# Altium PCB BLE_product-v1.0.PcbDoc (part 1 of 2)
Units mm, origin at the board's own origin, x right, y up, seen from the top; angles counter-clockwise.
Board outline 12 x 12.89 mm, 4 copper layers (Top Layer, Layer 2, Layer 3, Bottom Layer), stack 0.999 mm thick; 45 components, 33 nets, 183 pads, 89 vias.
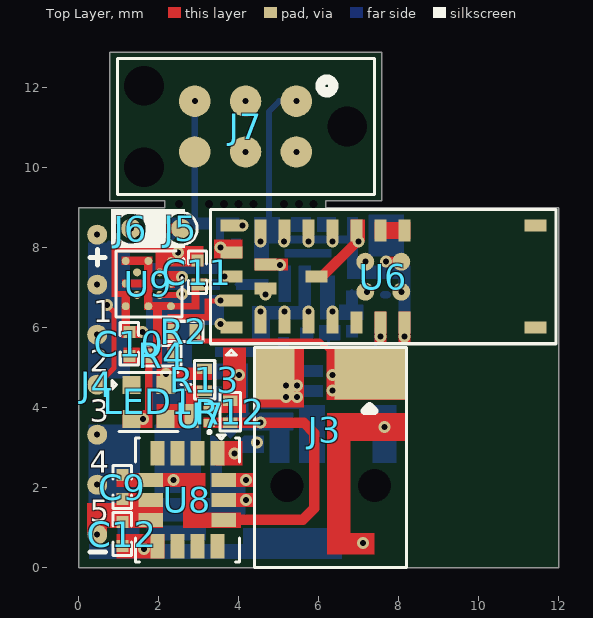
[diagram p0: Top Layer view]
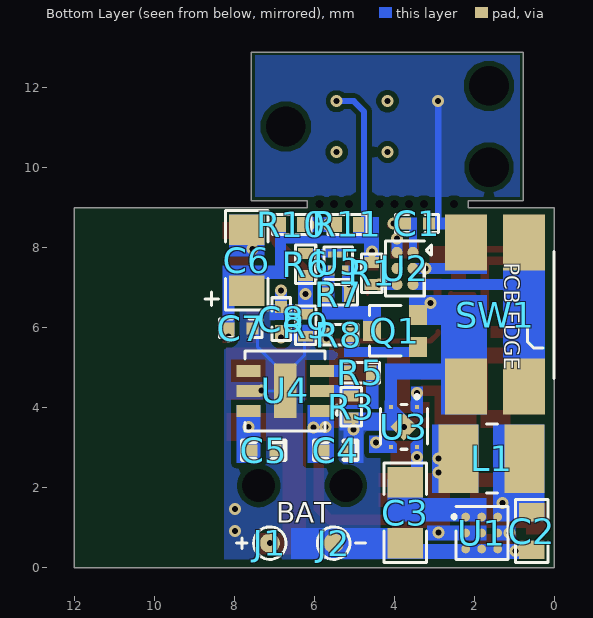
[diagram p1: Bottom Layer view, seen from below]
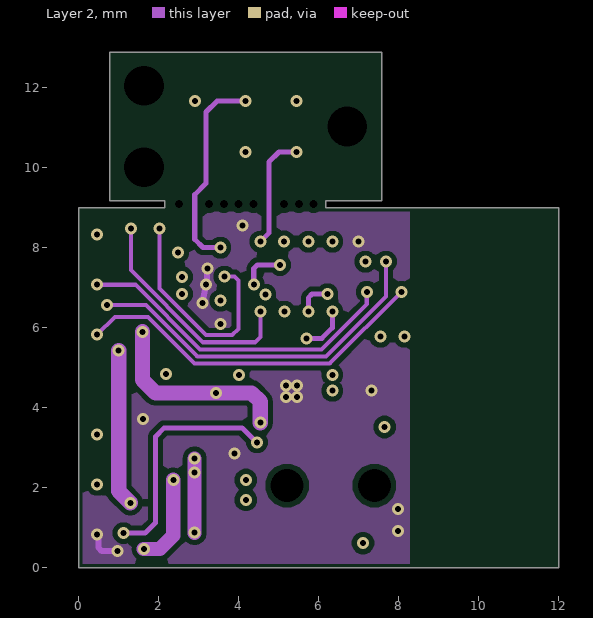
[diagram p2: Layer 2]
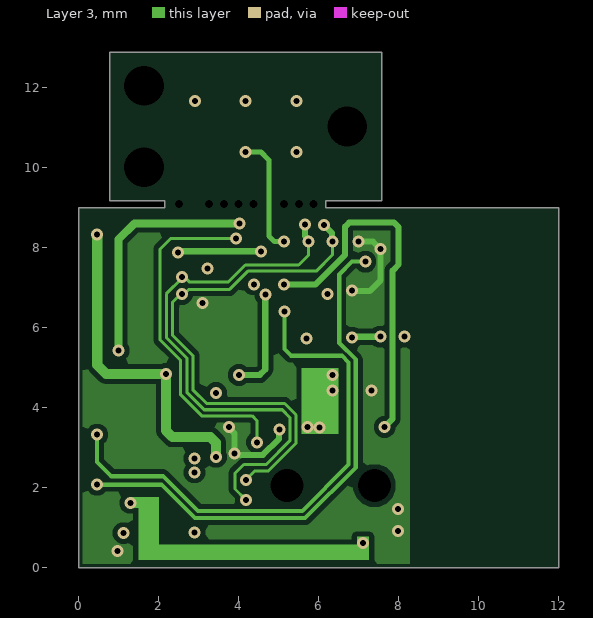
[diagram p3: Layer 3]
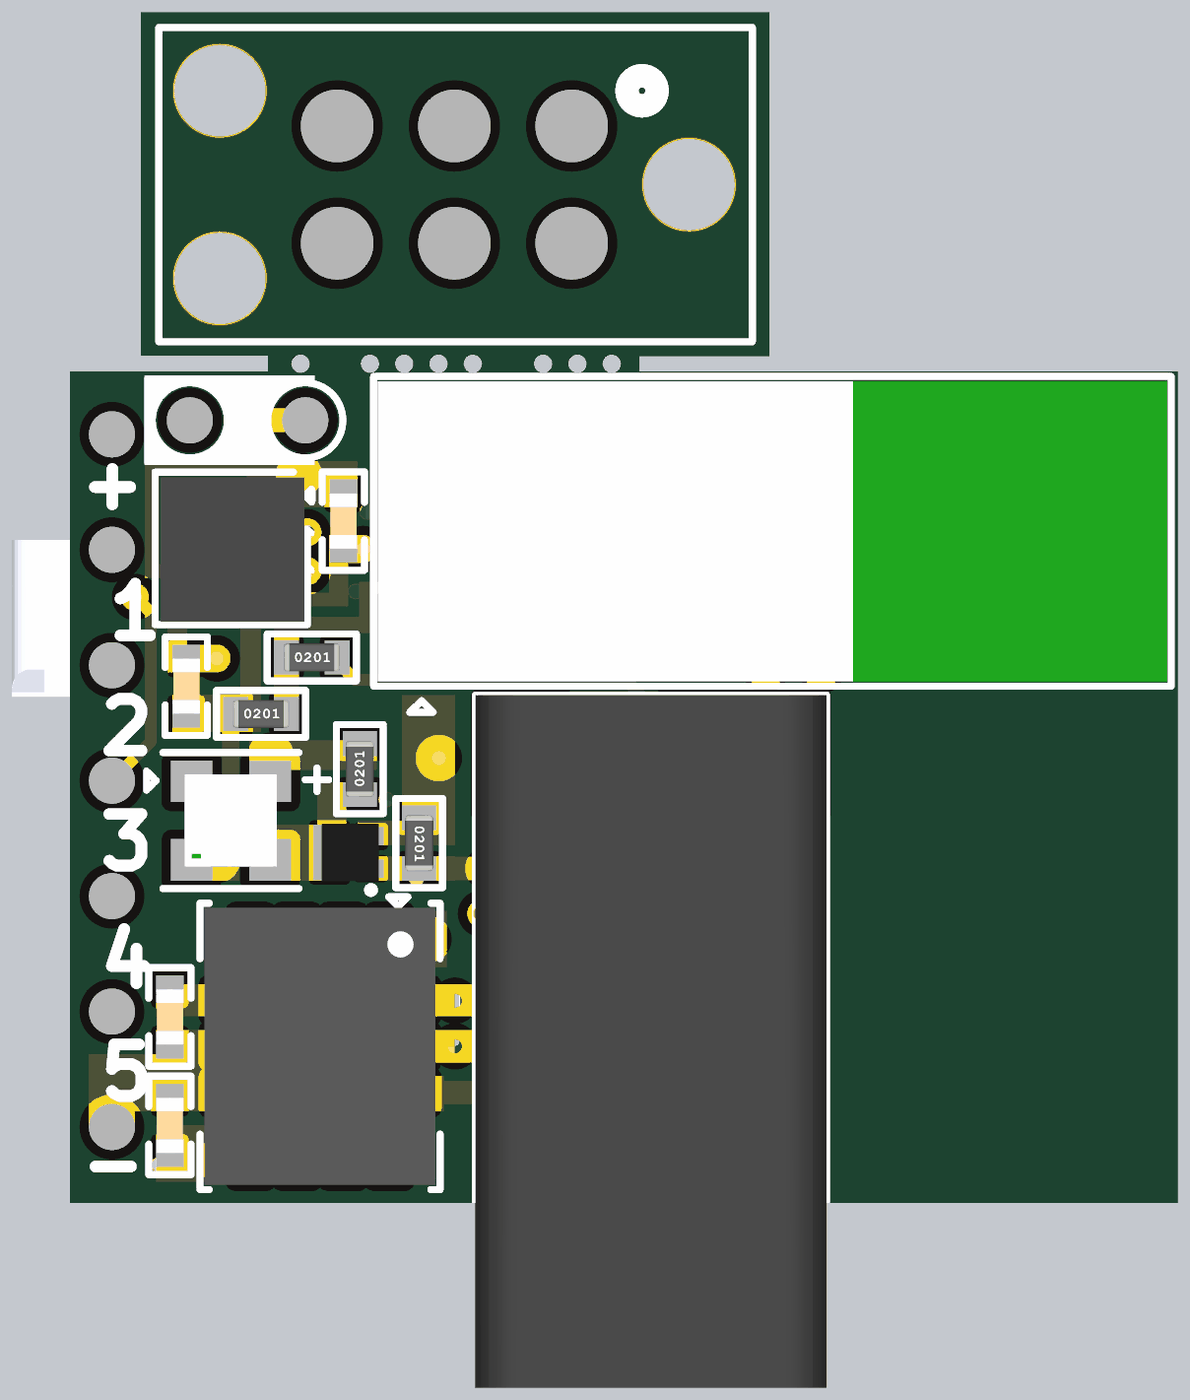
[diagram p4: 3D render of the assembled board from above, using the file's embedded part models]
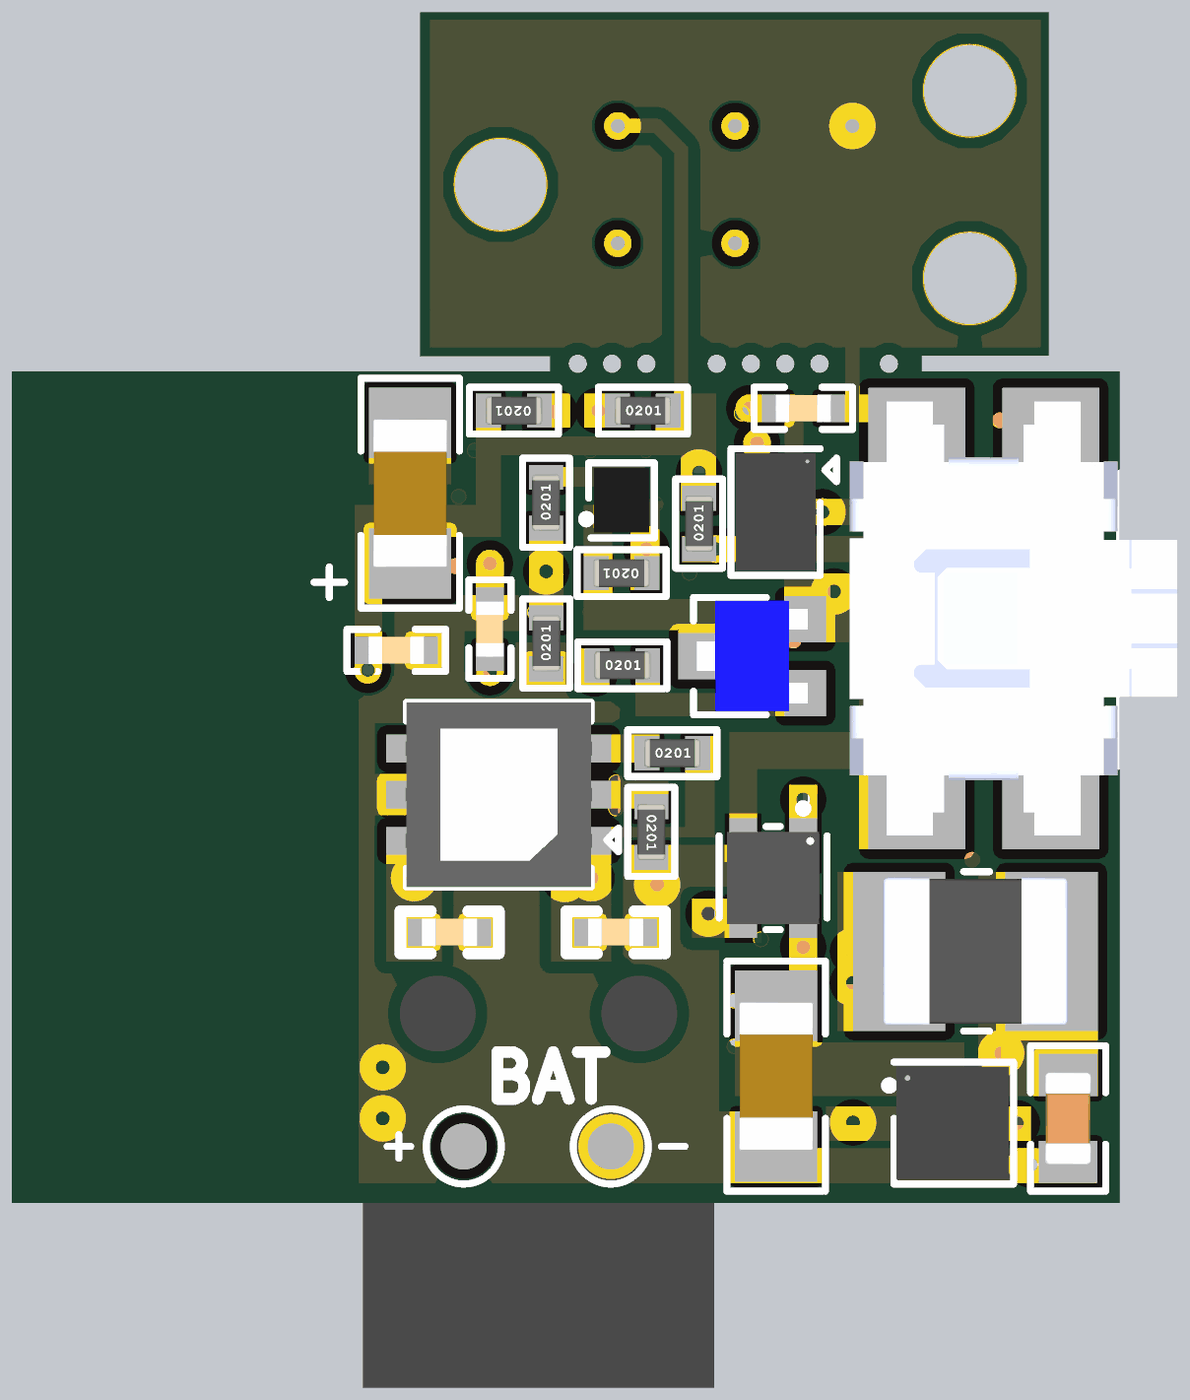
[diagram p5: 3D render of the assembled board from below, using the file's embedded part models]

## Layer stack, top to bottom
Top Solder: solder mask 0.0102, Solder Resist, Dk 3.5
Top Layer: signal copper 0.035
Dielectric 2: prepreg 0.1295, PP-017, Dk 4.3
Layer 2: signal copper 0.035
Dielectric 1: dielectric 0.6, FR-4, Dk 4.8
Layer 3: signal copper 0.035
Dielectric 3: prepreg 0.1295, PP-017, Dk 4.3
Bottom Layer: signal copper 0.035
Bottom Solder: solder mask 0.0102, Solder Resist, Dk 3.5

## Board outline
0,0 0,9 2.146,9 2.146,9.169 0.77,9.169 0.77,12.886 7.576,12.886 7.576,9.167 6.166,9.167 6.166,9 12,9 12,0

## Design rules (kind name [scope] priority, off if disabled: settings)
Clearance [All] p1: gap=0.076 ignorepadtopadclearanceinfootprint=FALSE except(0.127: Arc-Poly Track-Poly SMDPad-Poly THPad-Poly Via-Poly Fill-Poly Poly-Poly)
ComponentClearance [All] p1: gap=0 collisioncheckmode=3 verticalgap=0 showdistances=FALSE
HoleToHoleClearance [All] p1: gap=0.127 allowstackedmicrovias=TRUE
MinimumSolderMaskSliver [All] p1: minsoldermaskwidth=0
PolygonConnect PolygonConnect_TOP [HasFootprint('TC2030-IDC-NL_')] p1: connectstyle=Relief reliefconductorwidth=0.127 reliefentries=4 polygonreliefangle="90 Angle" airgapwidth=0.127
PolygonConnect [All] p2: connectstyle=Direct reliefconductorwidth=0.102 reliefentries=4 polygonreliefangle="90 Angle" airgapwidth=0.102
RoutingVias [All] p1: holewidth=0.15 width=0.3 viastyle="Through Hole" minholewidth=0.15 minwidth=0.3 maxholewidth=0.15 maxwidth=0.3
SilkToSilkClearance [All] p1: silktosilkclearance=0
SilkToSolderMaskClearance [IsPad] p1: minsilkscreentomaskgap=0 clearancetoexposedcopper=TRUE
SolderMaskExpansion [All] p1: expansion=0.102 istentingtop=FALSE
Width [All] p1: maxlimit=0.381 minlimit=0.076 preferedwidth=0.102 minimp=50.000000 maximp=50.000000 favimp=50.000000
25 further rules are at their usual default settings.

## Classes and differential pairs
component class U_Power_Sheet: C1 C2 C3 C4 C5 J1 J2 J3 L1 Q1 R1 R2 R3 R4 R5 R6 R7 R8 R9 SW1 U1 U2 U3 U4 U5
component class U_IMU_Sensor_Sheet: C9 C10 C11 C12 U8 U9
component class U_BLE_Module_Sheet: 2 C6 C7 C8 J4 J5 J6 J7 LED1 R10 R11 R12 R13 U6 U7

## Components (designator, comment, footprint, x,y, rotation, side; value= is the part's Value field where it differs from the comment)
C1 "0.1uF" CAP-0201 3.427,8.602 r0 bottom
C2 "10uF" Cap-0402 0.56,0.913 r90 bottom
C3 "22uF" Cap-0603 3.721,1.37 r90 bottom
C4 "1uF" CAP-0201 5.459,2.928 r0 bottom
C5 "2.2uf" CAP-0201 7.258,2.928 r0 bottom value=2.2uF
C6 "100uF" F980J107MMAAXE 7.684,6.92 r90 bottom
C7 "0.1uF" CAP-0201 7.834,5.981 r0 bottom
C8 "1uF" CAP-0201 6.821,6.21 r270 bottom
C9 "0.1uF" CAP-0201 1.084,2.011 r90 top
C10 "0.1uF" CAP-0201 1.261,5.593 r90 top
C11 "0.1uF" CAP-0201 2.963,7.381 r90 top
C12 "0.1uF" CAP-0201 1.084,0.838 r270 top
J1 "1 Sensor Pad 0.5mm" "1 Sensor Pad 0.5mm" 7.104,0.609 r180 bottom
J2 "1 Sensor Pad 0.5mm" "1 Sensor Pad 0.5mm" 5.512,0.609 r180 bottom
J3 "DC-096" DC-096 6.14,3.448 r270 top locked
J4 "Sensor Pads 0.5mm Dia" "Sensor-Pads 0.5mm Dia" 0.457,4.57 r270 top
J5 "1 Sensor Pad 0.5mm" "1 Sensor Pad 0.5mm" 2.551,8.471 r90 top
J6 "1 Sensor Pad 0.5mm" "1 Sensor Pad 0.5mm" 1.301,8.471 r90 top
J7 "TC2030-IDC-NL" TC2030-IDC-NL_ 4.166,11.024 r180 top
L1 "470nH" IND-0806 1.563,2.721 r180 bottom
LED1 "XL-1010RGBC-WS2812B" XL-1010RGBC-WS2812B 1.745,4.138 r0 top
Q1 "MMBT3904M" SOT-723 3.981,5.918 r90 bottom
R1 "10K" Res-0201 4.556,7.353 r90 bottom
R2 "22K" Res-0201 2.621,5.903 r0 top
R3 "10K" Res-0201 5.073,4.015 r270 bottom
R4 "33k" Res-0201 2.071,5.293 r0 top
R5 "10K" Res-0201 4.845,4.867 r180 bottom
R6 "100K" Res-0201 6.212,7.579 r90 bottom
R7 "4.7K" Res-0201 5.395,6.818 r0 bottom
R8 "4.7K" Res-0201 5.386,5.819 r180 bottom
R9 "100K" Res-0201 6.21,6.056 r90 bottom
R10 "4.7K" Res-0201 6.561,8.576 r0 bottom
R11 "4.7K" Res-0201 5.164,8.576 r180 bottom
R12 "10K" Res-0201 3.784,3.894 r270 top
R13 "10K" Res-0201 3.141,4.695 r90 top
SW1 "EVQ-P7A01P" EVQP7A01P 1.473,6.325 r90 bottom locked
U1 "FAN48610UC50X" "WLCSP-9 (1.22x1.22)" 1.811,0.863 r180 bottom
U2 "MAX16150AWT+" WLP-6(0.83x1.24) 3.728,7.478 r270 bottom
U3 "TLV73330PDQNR" X2-SON-4(1x1) 3.754,3.515 r270 bottom
U4 "FAN54120UC420X" DFN-6-EP(2x2) 6.725,4.418 r0 bottom
U5 "CSD25501F3" PicoStar-3 5.395,7.63 r180 bottom
U6 "EYSHSNZWZ" EYSHSNZWZ 7.609,7.27 r0 top locked
U7 "NTNS3193NZT5G" X-LLGA-3 3.037,3.793 r90 top
U8 "BMI323" "14-LGA (2.5x3)" 2.711,1.693 r270 top
U9 "BMM150" "12-WLCSP (1.56x1.56)" 1.736,7.098 r0 top locked

## Footprints (in the part's own frame and the unit in brackets; to place one, negate y for a bottom-side part, rotate by r counter-clockwise, add the part's x,y. Pads: shape width x height; smd on the part's side, far side on the other; paste and mask are expansions set on the pad)
"1 Sensor Pad 0.5mm" [mm]
  round 0.5 smd: 1(0,0)
  silkscreen extent -0.41,-0.41 0.4,0.41
"12-WLCSP (1.56x1.56)" [mm]
  round 0.2 smd mask+0.05: A1(0.566,0.566) A3(0.566,0) A5(0.566,-0.566) B2(0.283,0.283) B4(0.283,-0.283) C1(0,0.566) C5(0,-0.566) D2(-0.283,0.283) D4(-0.283,-0.283) E1(-0.566,0.566) E3(-0.566,0) E5(-0.566,-0.566)
  silkscreen extent -0.81,-0.84 0.89,0.81, body extent -0.75,-0.81 0.81,0.75, height 0.6
"14-LGA (2.5x3)" [mm]
  rect 0.61x0.35 smd: 1(-1.16,0.75) 2(-1.16,0.25) 3(-1.16,-0.25) 4(-1.16,-0.75) 8(1.16,-0.75) 9(1.16,-0.25) 10(1.16,0.25) 11(1.16,0.75)
  rect 0.35x0.61 smd: 5(-0.5,-0.91) 6(0,-0.91) 7(0.5,-0.91) 12(0.5,0.91) 13(0,0.91) 14(-0.5,0.91)
  silkscreen extent -1.55,-1.3 1.55,1.3, body extent -1.5,-1.25 1.5,1.25, height 0.86
CAP-0201 [mm]
  rect 0.3x0.3 smd mask+0.055: 1(-0.3,0) 2(0.3,0)
  silkscreen extent -0.53,-0.23 0.53,0.23, body extent -0.3,-0.15 0.3,0.15, height 0.28
Cap-0402 [mil]
  rect 18x25 smd mask+2.36: 1(-18.5,0) 2(18.5,0)
  silkscreen extent -31,-16 31,16, body extent -20,-10 20,10, height 19
Cap-0603 [mil]
  rect 30x35 smd mask+2.36: 1(-30,0) 2(30,0)
  silkscreen extent -49,-21 49,21, body extent -32,-16 31,16, height 34
DC-096 [mm]
  rect 1.3x1.8 smd mask+0.05: 1(-1.4,1.154)
  rect 1.3x1 smd mask+0.05: 2(-1.4,-1.246)
  round 0 hole 0.82 unplated mask+0.05: MH(1.4,1.246) MH(1.4,-0.937)
  silkscreen extent -2.05,-1.75 -0.46,2.05, body extent -2.05,-1.75 5.45,2.05, height 3.8
DFN-6-EP(2x2) [mm]
  rect 0.6x0.3 smd: 1(-0.917,0.5) 2(-0.917,0) 3(-0.917,-0.5) 4(0.918,-0.5) 5(0.918,0) 6(0.918,0.5)
  rect 0.56x1.37 smd: 7(0,0)
  silkscreen extent -1,-1 1,1, body extent -1.01,-1 1.01,1, height 0.76
EVQP7A01P [mm]
  rect 1.4x1.05 smd: 1(-1.8,0.725) 1(1.8,0.725) 2(-1.8,-0.725) 2(1.8,-0.725)
  silkscreen extent -1.6,-1.47 1.57,-0.81, body extent -2.35,-2.1 2.35,1.45, height 1.35
EYSHSNZWZ [mm]
  rect 0.55x0.3 smd: 1(-3.8,-1.275) 18(-3.8,1.275) 19(-3.8,0.6) 20(-3.8,0) 21(-3.8,-0.6) 22(-2.95,-0.3) 25(-2.95,0.3) 26(-1.675,0) 27(3.8,-1.275) 28(3.8,1.275)
  rect 0.3x0.55 smd: 2(-3.075,-1.15) 3(-2.475,-1.15) 4(-1.875,-1.15) 5(-1.275,-1.15) 6(-0.675,-1.15) 7(-0.075,-1.15) 8(0.525,-1.15) 11(0.525,1.15) 12(-0.075,1.15) 13(-0.675,1.15) 14(-1.275,1.15) 15(-1.875,1.15) 16(-2.475,1.15) 17(-3.075,1.15)
  round 0.45 smd: 9(0.45,-0.375) 10(0.45,0.375) 23(-0.45,-0.375) 24(-0.45,0.375)
  silkscreen extent -4.32,-1.68 4.32,1.68, body extent -4.28,-1.63 4.28,1.63, height 0.85
F980J107MMAAXE [mil]
  rect 30x35 smd mask+2.36: 1(0,0) 2(60,0)
  silkscreen extent -19,-21 79,21, body extent -2,-16 61,16, height 34
IND-0806 [mm]
  rect 1x1.72 smd: 1(-0.825,0) 2(0.825,0)
  silkscreen extent -0.13,-0.86 0.15,0.86, body extent -1,-0.8 1,0.8, height 1.2
PicoStar-3 [mm]
  rect 0.152x0.25 smd mask+0.05: 1(-0.175,-0.2) 2(0.175,-0.2)
  rect 0.5x0.152 smd mask+0.05: 3(0,0.2)
  silkscreen extent -0.41,-0.43 0.36,0.38, body extent -0.3,-0.38 0.3,0.32, height 0.2
Res-0201 [mm]
  rect 0.27x0.37 smd mask+0.055: 1(-0.275,0) 2(0.275,0)
  silkscreen extent -0.48,-0.25 0.48,0.25, body extent -0.3,-0.15 0.3,0.15, height 0.29
"Sensor-Pads 0.5mm Dia" [mm]
  round 0.5 smd: 1(-3.75,0) 2(-2.5,0) 3(-1.25,0) 4(0,0) 5(1.25,0) 6(2.5,0) 7(3.75,0)
SOT-723 [mm]
  rect 0.5x0.45 smd: 1(-0.4,-0.575) 2(0.4,-0.575) 3(0,0.575)
  silkscreen extent -0.64,-0.15 0.64,0.64, body extent -0.6,-0.6 0.6,0.6, height 0.5
TC2030-IDC-NL_ [mil]
  round 30.98 smd: 1(-50,-25) 1(-50,-25) 2(-50,25) 3(0,-25) 4(0,25) 5(50,-25) 6(50,25)
  round 0 hole 39.02: MP1(-100,0) MP2(100,40) MP3(100,-40)
  silkscreen extent -127,-67 126,67
"WLCSP-9 (1.22x1.22)" [mm]
  round 0.218 smd mask+0.055: A1(-0.4,0.4) A2(0,0.4) A3(0.4,0.4) B1(-0.4,0) B2(0,0) B3(0.4,0) C1(-0.4,-0.4) C2(0,-0.4) C3(0.4,-0.4)
  silkscreen extent -0.71,-0.66 0.66,0.66, body extent -0.61,-0.61 0.61,0.61, height 0.59
WLP-6(0.83x1.24) [mm]
  round 0.28 smd mask+0.055: A1(-0.4,0.2) A2(0,0.2) A3(0.4,0.2) B1(-0.4,-0.2) B2(0,-0.2) B3(0.4,-0.2)
  silkscreen extent -0.69,-0.48 0.69,0.66, body extent -0.64,-0.43 0.64,0.43, height 0.69
X2-SON-4(1x1) [mm]
  rect 0.1x0.1 smd paste-1 mask+0: 1(-0.5,0.325) 2(-0.5,-0.325) 3(0.5,-0.325) 4(0.5,0.325)
  rect 0.48x0.48 smd rot 135: 5(0,0)
  Top Layer region: 0.42,0.175 0.22,0.375 0.22,0.475 0.65,0.475 0.65,0.175
  Top Layer region: 0.22,-0.475 0.22,-0.375 0.42,-0.175 0.65,-0.175 0.65,-0.475
  Top Layer region: -0.65,-0.475 -0.65,-0.175 -0.42,-0.175 -0.22,-0.375 -0.22,-0.475
  Top Layer region: -0.42,0.175 -0.65,0.175 -0.65,0.475 -0.12,0.475
  silkscreen extent -0.78,-0.58 0.56,0.58, body extent -0.5,-0.5 0.5,0.5, height 0.58
X-LLGA-3 [mm]
  rect 0.2x0.28 smd mask+0.05: 1(-0.175,-0.222) 2(0.175,-0.222)
  rect 0.6x0.35 smd mask+0.05: 3(0,0.223)
  silkscreen extent -0.43,-0.25 -0.38,-0.2, body extent -0.31,-0.31 0.31,0.31, height 0.29
XL-1010RGBC-WS2812B [mm]
  rect 0.45x0.45 smd: 1(-0.425,0.425) 2(0.425,0.425) 3(-0.425,-0.425) 4(0.425,-0.425)
  silkscreen extent -0.74,-0.74 0.74,0.74, body extent -0.5,-0.5 0.5,0.5, height 0.81

## Part data
C1 C7 C9 C10 C11 C12: library part CC0201KRX5R6BB104, "CAP CER 0.1UF 10V X5R 0201", Capacitance=100nF, Case Code (Imperial)=0201, Case Code (Metric)=0603, Dielectric=X5R, LCSC Part Number=C190183, Manufacturer=Yageo, Max Operating Temperature=85°C, Min Operating Temperature=-55°C, Resistor Type=Ceramic, Supplier Part Number 1=603-CC201KRX5R6BB104, Tolerance=10%, Voltage Rating=10V, Case/Package=0201, Category="Ceramic Capacitors", ComponentLink1Description=https://datasheet.ciiva.com/11587/upy-gphc-x5r-4v-to-50v-12-11587190.pdf?src-supplier=Avnet, ComponentLink1URL=https://datasheet.ciiva.com/11587/upy-gphc-x5r-4v-to-50v-12-11587190.pdf?src-supplier=Avnet, Construction=Flat, Depth=0.3mm, Halogen Free="Halogen Free", Height=0.3mm, Lead Free="Lead Free", Length=0.6mm, Manufacturer Part Number=CC0201KRX5R6BB104, Mount="Surface Mount", Packaging="Tape and Reel", Pricing 1="1=0.10000, 10=0.02400, 50=0.02400, 100=0.01900, 1000=0.01100, 10000=0.00900 (USD)", Radiation Hardening=No, RoHS=Yes, RoHS Compliant=Yes, Series=CC, Stock 1=824403, Supplier 1=Mouser, Termination=SMD/SMT, Thickness=0.013inch, Voltage Rating (DC)=10V, Weight=6E-06oz, Width=0.012inch
C2: library part CL05A106MP5NUNC, "CAP CER 10UF 10V X5R 0402", Case Code (Imperial)=0402, Case Code (Metric)=1005, Dielectric=X5R, LCSC Part Number=C315248, Manufacturer=Samsung, Max Operating Temperature=85°C, Min Operating Temperature=-55°C, Package Quantity=1, Tolerance=20%, Voltage Rating=10V, Capacitance=10uF, Case/Package=0402, Category="Ceramic Capacitors", ComponentLink1Description=https://datasheet.ciiva.com/25721/cl05a106mp5nunc-25721584.pdf?src-supplier=Digi-Key, ComponentLink1URL=https://datasheet.ciiva.com/25721/cl05a106mp5nunc-25721584.pdf?src-supplier=Digi-Key, ComponentLink2Description=https://datasheet.ciiva.com/26838/getdatasheetpartid-745310-26838170.pdf?src-supplier=Verical, ComponentLink2URL=https://datasheet.ciiva.com/26838/getdatasheetpartid-745310-26838170.pdf?src-supplier=Verical, Construction=Flat, Contact Plating=Tin, Depth=0.5mm, Item Type=Capacitor, Lead Free="Lead Free", Length=1mm, Manufacturer Part Number=CL05A106MP5NUNC, Mount="Surface Mount", Packaging="Tape and Reel", Pricing 1="10000=0.02537 (USD)", Radiation Hardening=No, RoHS=Yes, RoHS Compliant=Yes, Series=CL, Stock 1=1729850, Supplier 1=Avnet, Supplier Part Number 1=CL05A106MP5NUNC, Termination=Wraparound, Thickness=0.028inch, Width=0.02inch
C3: library part CC0603MRX5R6BB226, "CAP CER 22UF 10V X5R 0603", Case Code (Imperial)=0603, Case Code (Metric)=1608, Dielectric=X5R, LCSC Part Number=C109447, Manufacturer=Yageo, Max Operating Temperature=85°C, Min Operating Temperature=-55°C, Package Quantity=4000, Supplier Part Number 1=311-1819-1-ND, Tolerance=20%, Voltage Rating=10V, Capacitance=22uF, Case/Package=0603, Category="Ceramic Capacitors", ComponentLink1Description=http://www.mouser.com/ds/2/447/Yageo_UPY-GP_NP0_16V-to-50V_9-358835.pdf?src-supplier=Mouser, ComponentLink1URL=http://www.mouser.com/ds/2/447/Yageo_UPY-GP_NP0_16V-to-50V_9-358835.pdf?src-supplier=Mouser, ComponentLink2Description=http://www.yageo.com/documents/recent/UPY-GPHC_X5R_4V-to-50V_25.pdf?src-supplier=Digi-Key, ComponentLink2URL=http://www.yageo.com/documents/recent/UPY-GPHC_X5R_4V-to-50V_25.pdf?src-supplier=Digi-Key, Halogen Free="Halogen Free", Height=0.8mm, Item Type=Capacitor, Lead Free="Lead Free", Length=0.063inch, Manufacturer Part Number=CC0603MRX5R6BB226, Mount="Surface Mount", Packaging="Tape and Reel", Pricing 1="1=0.68000, 10=0.48000, 50=0.36300, 100=0.31610, 500=0.23416, 1000=0.19903 (USD)", RoHS=Yes, RoHS Compliant=Yes, Stock 1=19628, Supplier 1=Digi-Key, Termination=SMD/SMT, Thickness=0.035inch, Voltage Rating (DC)=10V, Weight=7.1E-05oz, Width=0.8mm
C4: library part CC0201MRX5R6BB105, "CAP CER 1UF 10V X5R 0201", LCSC Part Number=C605210, Manufacturer=Yageo, Supplier Part Number=311-3474-1-ND, Category="Ceramic Capacitors", ComponentLink1Description=https://datasheet.octopart.com/CC0201MRX5R6BB105-Yageo-datasheet-158238148.pdf?src-supplier=Farnell, ComponentLink1URL=https://datasheet.octopart.com/CC0201MRX5R6BB105-Yageo-datasheet-158238148.pdf?src-supplier=Farnell, ComponentLink2Description=http://www.yageo.com/documents/recent/UPY-GPHC_X5R_4V-to-50V_25.pdf?src-supplier=Digi-Key, ComponentLink2URL=http://www.yageo.com/documents/recent/UPY-GPHC_X5R_4V-to-50V_25.pdf?src-supplier=Digi-Key, ComponentLink3Description=https://datasheet.octopart.com/CC0201MRX5R6BB105-Yageo-datasheet-137700082.pdf?src-supplier=Future+Electronics, ComponentLink3URL=https://datasheet.octopart.com/CC0201MRX5R6BB105-Yageo-datasheet-137700082.pdf?src-supplier=Future+Electronics, Item Type=Capacitor, Manufacturer Part Number=CC0201MRX5R6BB105, Pricing="1=0.19, 10=0.135, 50=0.0764, 100=0.0633, 500=0.04436, 1000=0.03672, 2500=0.03418, 5000=0.03127 (USD)", RoHS=Yes, Stock=772400, Supplier=Digi-Key
C5: library part CC0201MRX5R6BB225, "CAP CER 2.2UF 10V X5R 0201", Case/Package=0201, LCSC Part Number=C2186869, Manufacturer=Yageo, Max Operating Temperature=85°C, Min Operating Temperature=-55°C, Supplier Part Number=603-CC0201MRX56BB225, Tolerance=20%, Voltage Rating=10V, Category="Ceramic Capacitors", ComponentLink1Description=https://www.yageo.com/upload/media/product/productsearch/datasheet/mlcc/UPY-GPHC_X5R_4V-to-50V_26.pdf?src-supplier=Digi-Key, ComponentLink1URL=https://www.yageo.com/upload/media/product/productsearch/datasheet/mlcc/UPY-GPHC_X5R_4V-to-50V_26.pdf?src-supplier=Digi-Key, Item Type=Capacitor, Manufacturer Part Number=CC0201MRX5R6BB225, Mounting Technology="Surface Mount", Packaging="Tape and Reel", Pricing="1=0.43, 10=0.294, 50=0.294, 100=0.176, 1000=0.112, 10000=0.091 (USD)", RoHS=Yes, RoHS Compliant=Yes, Series=CC, Stock=25553, Supplier=Mouser
C6: library part F980J107MMAAXE, "CAP TANT 100UF 20% 6.3V 0603", LCSC Part Number=C1955164, Manufacturer="Kyocera AVX", Supplier Part Number=478-9836-1-ND, Category="Tantalum Capacitors", ComponentLink1Description=http://www.farnell.com/datasheets/2602422.pdf?src-supplier=Farnell, ComponentLink1URL=http://www.farnell.com/datasheets/2602422.pdf?src-supplier=Farnell, ComponentLink2Description=https://datasheet.octopart.com/F980J107MMAAXE-AVX-datasheet-104407997.pdf?src-supplier=Newark, ComponentLink2URL=https://datasheet.octopart.com/F980J107MMAAXE-AVX-datasheet-104407997.pdf?src-supplier=Newark, ComponentLink3Description=https://datasheet.octopart.com/F980J107MMAAXE-KYOCERA-AVX-datasheet-57254939.pdf?src-supplier=Future+Electronics, ComponentLink3URL=https://datasheet.octopart.com/F980J107MMAAXE-KYOCERA-AVX-datasheet-57254939.pdf?src-supplier=Future+Electronics, ComponentLink4Description=http://datasheets.avx.com/F98.pdf?src-supplier=Digi-Key, ComponentLink4URL=http://datasheets.avx.com/F98.pdf?src-supplier=Digi-Key, ComponentLink5Description=http://www.farnell.com/datasheets/2649022.pdf?src-supplier=Newark, ComponentLink5URL=http://www.farnell.com/datasheets/2649022.pdf?src-supplier=Newark, Item Type=Capacitor, Manufacturer Part Number=F980J107MMAAXE, Pricing="1=0.71, 10=0.505, 50=0.382, 100=0.3327, 500=0.24644, 1000=0.20947 (USD)", RoHS=Yes, Stock=133089, Supplier=Digi-Key
C8: library part CC0201MRX5R7BB105, "CAP CER 1UF 16V X5R 0201", LCSC Part Number=C5182464, Manufacturer=Yageo, Supplier Part Number=13-CC0201MRX5R7BB105TR-ND, Category="Ceramic Capacitors", Item Type=Capacitor, Manufacturer Part Number=CC0201MRX5R7BB105, RoHS=Yes, Supplier=Digi-Key
J1 J2 J5 J6: "Wire Connecting Pad 0.5mm", Item Type="SMD Pad", Manufacturer Part Number="1 Sensor Pad 0.5mm"
J3: "DC Power Jack Socket Female Panel Mount Connector", Manufacturer="CW Switch Elec. Store", Item Type="DC Jack Female", Manufacturer Part Number=DC-096
J4: "Wire Connecting Pad", Manufacturer Part Number="Sensor Pads", Item Type="SMD Pads"
L1: library part 1286AS-H-R47M=P2, "FIXED IND 470NH 3.4A 52 MOHM SMD", Case Code (Imperial)=0806, Case Code (Metric)=2016, Current Rating=3.4A, DC Resistance (DCR)=52mR, LCSC Part Number=C160957, Manufacturer=Murata, Manufacturer Part Number=1286AS-H-R47M=P2, Max DC Current=3.8A, Max Operating Temperature=85°C, Min Operating Temperature=-40°C, Supplier Part Number=490-10606-1-ND, Test Frequency=1MHz, Tolerance=20%, Case/Package=0806, Category="Fixed Inductors", ComponentLink1Description=http://www.farnell.com/datasheets/2021974.pdf?src-supplier=Farnell, ComponentLink1URL=http://www.farnell.com/datasheets/2021974.pdf?src-supplier=Farnell, ComponentLink2Description=http://www.toko.co.jp/products/pdf/inductors/dfe201612c.pdf?src-supplier=Avnet, ComponentLink2URL=http://www.toko.co.jp/products/pdf/inductors/dfe201612c.pdf?src-supplier=Avnet, ComponentLink3Description=http://search.murata.co.jp/Ceramy/image/img/P02/J(E)TE243A-0010_DFE201612C_reference.pdf?src-supplier=Digi-Key, ComponentLink3URL=http://search.murata.co.jp/Ceramy/image/img/P02/J(E)TE243A-0010_DFE201612C_reference.pdf?src-supplier=Digi-Key, ComponentLink4Description=http://www.toko.co.jp/products/pdf/inductors/dfe201612c.pdf?src-supplier=Digi-Key, ComponentLink4URL=http://www.toko.co.jp/products/pdf/inductors/dfe201612c.pdf?src-supplier=Digi-Key, Core Material=Ferrite, Depth=1.6mm, Height - Seated (Max)=0.047inch, Item Type=Inductor, Length=0.079inch, Mounting Technology="Surface Mount", Packaging="Cut Tape", Pricing="1=0.39, 10=0.348, 25=0.3048, 50=0.2612, 100=0.2394, 250=0.21764, 500=0.2046, 1000=0.15671 (USD)", RoHS=Yes, RoHS Compliant=Yes, Series=DFE201612C, Shielding=Shielded, Stock=12493, Supplier=Digi-Key, Width=0.063inch
LED1: "Colorless transparence -40℃~+150℃ 正贴 RGB 120° 1010 Light Emitting Diodes (LED) ROHS", LCSC Part Number=C5349953, Manufacturer=XINGLIGHT, Package=1010, ComponentLink1Description=LCSC, ComponentLink1URL=https://www.lcsc.com/product-detail/Light-Emitting-Diodes-LED_XINGLIGHT-XL-1010RGBC-WS2812B_C5349953.html, Item Type="RGB LED", Manufacturer Part Number=XL-1010RGBC-WS2812B
Q1: "40V 100mW 100@10mA,1V 200mA 300MHz 300mV@50mA,5mA NPN -55℃~+150℃@(Tj) SOT-723 Bipolar Transistors - BJT ROHS", LCSC Part Number=C2923360, Manufacturer="TECH PUBLIC", Package=SOT-723, ComponentLink1Description=LCSC, ComponentLink1URL=https://www.lcsc.com/product-detail/Bipolar-Transistors-BJT_TECH-PUBLIC-MMBT3904M_C2923360.html, Item Type=Mosfet, Manufacturer Part Number=MMBT3904M
R1 R3 R5 R12 R13: library part RC0201JR-0710KL, "RES SMD 10K OHM 5% 1/20W 0201", Case Code (Imperial)=0201, Case Code (Metric)=0603, LCSC Part Number=C138117, Manufacturer=Yageo, Max Operating Temperature=125°C, Min Operating Temperature=-55°C, Power Rating=50mW, Resistance=10kR, Resistor Type="Thick Film", Supplier Part Number 1=311-10KNCT-ND, Temperature Coefficient=200ppm/°C, Tolerance=5%, Voltage Rating=25V, Case/Package=0201, Category="Chip SMD Resistors", ComponentLink1Description="New link", ComponentLink2Description=https://datasheet.ciiva.com/8891/pyu-rc0201-51-rohs-l-8-8891388.pdf?src-supplier=Avnet, ComponentLink2URL=https://datasheet.ciiva.com/8891/pyu-rc0201-51-rohs-l-8-8891388.pdf?src-supplier=Avnet, ComponentLink3Description=https://datasheet.ciiva.com/7672/1563626-7672253.pdf?src-supplier=Element14, ComponentLink3URL=https://datasheet.ciiva.com/7672/1563626-7672253.pdf?src-supplier=Element14, ComponentLink4Description=https://datasheet.ciiva.com/28405/pyu-rc0201-51-rohs-l-8-28405613.pdf?src-supplier=Avnet+Europe, ComponentLink4URL=https://datasheet.ciiva.com/28405/pyu-rc0201-51-rohs-l-8-28405613.pdf?src-supplier=Avnet+Europe, ComponentLink5Description=https://datasheet.ciiva.com/7672/1563626-7672254.pdf?src-supplier=Element14, ComponentLink5URL=https://datasheet.ciiva.com/7672/1563626-7672254.pdf?src-supplier=Element14, ComponentLink6Description=https://datasheet.ciiva.com/7660/1421516-7660810.pdf?src-supplier=Element14, ComponentLink6URL=https://datasheet.ciiva.com/7660/1421516-7660810.pdf?src-supplier=Element14, ComponentLink7Description=https://datasheet.ciiva.com/16856/pyu-rc0201-51-rohs-l-8-16856011.pdf?src-supplier=Avnet+Europe, ComponentLink7URL=https://datasheet.ciiva.com/16856/pyu-rc0201-51-rohs-l-8-16856011.pdf?src-supplier=Avnet+Europe, ComponentLink8Description=https://datasheet.ciiva.com/46391/1421516-46391291.pdf?src-supplier=Element14, ComponentLink8URL=https://datasheet.ciiva.com/46391/1421516-46391291.pdf?src-supplier=Element14, Contact Plating=Tin,Matte, Depth=0.3mm, Lead Free="Lead Free", Length=0.6mm, Manufacturer Part Number=RC0201JR-0710KL, Military Standard=Not, Packaging="Tape and Reel", Pricing 1="1=0.10000, 10=0.02600, 100=0.01050, 1000=0.00472, 2500=0.00410, 5000=0.00338 (USD)", Radiation Hardening=No, REACH SVHC=Unknown, RoHS=Yes, Stock 1=1488597, Supplier 1=Digi-Key, Termination=SMD/SMT, Voltage Rating (DC)=25V
R2: library part 0201WMF2202TEE, "50mW Thick Film Resistors ±1% ±200ppm/℃ 22kΩ 0201 Chip Resistor - Surface Mount ROHS", LCSC Part Number=C473469, Manufacturer=UNI-ROYAL, Package=0201, ComponentLink1Description=LCSC, ComponentLink1URL=https://www.lcsc.com/product-detail/Chip-Resistor-Surface-Mount_UNI-ROYAL-Uniroyal-Elec-0201WMF2202TEE_C473469.html, Item Type=Resistor, Manufacturer Part Number=0201WMF2202TEE
R4: library part 0201WMF3302TEE, "50mW Thick Film Resistors ±1% ±200ppm/℃ 33kΩ 0201 Chip Resistor - Surface Mount ROHS", LCSC Part Number=C473534, Manufacturer=UNI-ROYAL, Package=0201, ComponentLink1Description=LCSC, ComponentLink1URL=https://www.lcsc.com/product-detail/Chip-Resistor-Surface-Mount_UNI-ROYAL-Uniroyal-Elec-0201WMF3302TEE_C473534.html, Item Type=Resistor, Manufacturer Part Number=0201WMF3302TEE
R6 R9: library part 0201WMD1003TEE, "50mW Thick Film Resistors ±0.5% 100kΩ 0201 Chip Resistor - Surface Mount ROHS", LCSC Part Number=C778396, Manufacturer=UNI-ROYAL, Package=0201, ComponentLink1Description=LCSC, ComponentLink1URL=https://www.lcsc.com/product-detail/Chip-Resistor-Surface-Mount_UNI-ROYAL-Uniroyal-Elec-0201WMD1003TEE_C778396.html, Item Type=Resistor, Manufacturer Part Number=0201WMD1003TEE
R7 R8 R10 R11: library part RC0201FR-074K7L, "RES 4.7K OHM 1% 1/20W 0201", LCSC Part Number=C138135, Manufacturer=Yageo, Supplier Part Number=7537285, Category="Chip SMD Resistors", ComponentLink1Description=https://datasheet.ciiva.com/2493/pyu-r-int-thick-7-2493811.pdf?src-supplier=Digi-Key, ComponentLink1URL=https://datasheet.ciiva.com/2493/pyu-r-int-thick-7-2493811.pdf?src-supplier=Digi-Key, ComponentLink2Description=https://datasheet.ciiva.com/2493/pyu-r-int-thick-7-2493812.pdf?src-supplier=Digi-Key, ComponentLink2URL=https://datasheet.ciiva.com/2493/pyu-r-int-thick-7-2493812.pdf?src-supplier=Digi-Key, ComponentLink3Description=https://datasheet.ciiva.com/2493/pyu-r-int-thick-7-2493813.pdf?src-supplier=Digi-Key, ComponentLink3URL=https://datasheet.ciiva.com/2493/pyu-r-int-thick-7-2493813.pdf?src-supplier=Digi-Key, ComponentLink4Description=https://datasheet.ciiva.com/8892/pyu-rc0201-51-rohs-l-8-8892942.pdf?src-supplier=Avnet, ComponentLink4URL=https://datasheet.ciiva.com/8892/pyu-rc0201-51-rohs-l-8-8892942.pdf?src-supplier=Avnet, ComponentLink5Description=https://datasheet.ciiva.com/7672/1563626-7672233.pdf?src-supplier=Element14, ComponentLink5URL=https://datasheet.ciiva.com/7672/1563626-7672233.pdf?src-supplier=Element14, Item Type=Resistor, Manufacturer Part Number=RC0201FR-074K7L, Pricing="10000=0.0014, 50000=0.0013, 250000=0.0013, 750000=0.0012, 2000000=0.0011 (USD)", RoHS=Yes, Stock=1610000, Supplier="Future Electronics"
SW1: "SWITCH TACTILE SPST-NO 0.05A 12V", Actuator Color=Black, Case/Package=SMD/SMT, Contact Current Rating=50mA, Contact Resistance=500mR, LCSC Part Number=C79167, Manufacturer=Panasonic, Max Operating Temperature=70°C, Max Voltage Rating (DC)=12V, Min Operating Temperature=-20°C, Operating Force=2.2N, Package Quantity=5000, Supplier Part Number=667-EVQP7A01P, Actuator Length=0.65mm, Category="Tactile Switches", ComponentLink1Description=http://uk.rs-online.com/webdocs/13a5/0900766b813a5dbe.pdf?src-supplier=Rs, ComponentLink1URL=http://uk.rs-online.com/webdocs/13a5/0900766b813a5dbe.pdf?src-supplier=Rs, ComponentLink2Description=http://datasheet.octopart.com/EVQ-P7A01P-Panasonic-datasheet-98950114.pdf?src-supplier=Rs, ComponentLink2URL=http://datasheet.octopart.com/EVQ-P7A01P-Panasonic-datasheet-98950114.pdf?src-supplier=Rs, ComponentLink3Description=https://www3.panasonic.biz/ac/e_download/control/switch/light-touch/catalog/sw_lt_eng_3529s_side.pdf?src-supplier=Verical, ComponentLink3URL=https://www3.panasonic.biz/ac/e_download/control/switch/light-touch/catalog/sw_lt_eng_3529s_side.pdf?src-supplier=Verical, ComponentLink4Description=https://www3.panasonic.biz/ac/e_download/control/switch/light-touch/catalog/sw_lt_eng_3529s_side.pdf?src-supplier=Onlinecomponents.com, ComponentLink4URL=https://www3.panasonic.biz/ac/e_download/control/switch/light-touch/catalog/sw_lt_eng_3529s_side.pdf?src-supplier=Onlinecomponents.com, ComponentLink5Description=https://www3.panasonic.biz/ac/e_download/control/switch/light-touch/catalog/sw_lt_eng_3529s_side.pdf?src-supplier=Arrow+Electronics, ComponentLink5URL=https://www3.panasonic.biz/ac/e_download/control/switch/light-touch/catalog/sw_lt_eng_3529s_side.pdf?src-supplier=Arrow+Electronics, ComponentLink6Description=https://www3.panasonic.biz/ac/e_download/control/switch/light-touch/catalog/sw_lt_eng_3529s_side.pdf?src-supplier=Avnet, ComponentLink6URL=https://www3.panasonic.biz/ac/e_download/control/switch/light-touch/catalog/sw_lt_eng_3529s_side.pdf?src-supplier=Avnet, ComponentLink7Description=http://www.farnell.com/datasheets/1790605.pdf?src-supplier=Newark, ComponentLink7URL=http://www.farnell.com/datasheets/1790605.pdf?src-supplier=Newark, ComponentLink8Description=https://datasheet.octopart.com/EVQ-P7A01P-Panasonic-datasheet-98950114.pdf?src-supplier=Future+Electronics, ComponentLink8URL=https://datasheet.octopart.com/EVQ-P7A01P-Panasonic-datasheet-98950114.pdf?src-supplier=Future+Electronics, ComponentLink9Description=https://www3.panasonic.biz/ac/e_download/control/switch/light-touch/catalog/sw_lt_eng_3529s_side.pdf?src-supplier=Mouser, ComponentLink9URL=https://www3.panasonic.biz/ac/e_download/control/switch/light-touch/catalog/sw_lt_eng_3529s_side.pdf?src-supplier=Mouser, ComponentLink10Description=https://www3.panasonic.biz/ac/e_download/control/switch/light-touch/catalog/sw_lt_eng_3529s_side.pdf?src-supplier=Allied+Electronics, ComponentLink10URL=https://www3.panasonic.biz/ac/e_download/control/switch/light-touch/catalog/sw_lt_eng_3529s_side.pdf?src-supplier=Allied+Electronics, ComponentLink11Description=http://datasheet.octopart.com/EVQ-P7A01P-Panasonic-datasheet-98950114.pdf?src-supplier=Future+Electronics, ComponentLink11URL=http://datasheet.octopart.com/EVQ-P7A01P-Panasonic-datasheet-98950114.pdf?src-supplier=Future+Electronics, ComponentLink12Description=http://datasheet.octopart.com/EVQ-P7A01P-Panasonic-datasheet-98950114.pdf?src-supplier=Distrelec, ComponentLink12URL=http://datasheet.octopart.com/EVQ-P7A01P-Panasonic-datasheet-98950114.pdf?src-supplier=Distrelec, ComponentLink13Description=http://datasheet.octopart.com/EVQ-P7A01P-Panasonic-datasheet-98950114.pdf?src-supplier=Farnell, ComponentLink13URL=http://datasheet.octopart.com/EVQ-P7A01P-Panasonic-datasheet-98950114.pdf?src-supplier=Farnell, ComponentLink14Description=http://www.farnell.com/datasheets/1790605.pdf?src-supplier=Element14, ComponentLink14URL=http://www.farnell.com/datasheets/1790605.pdf?src-supplier=Element14, ComponentLink15Description=http://industrial.panasonic.com/www-data/pdf/ATK0000/ATK0000CE20.pdf?src-supplier=Farnell, ComponentLink15URL=http://industrial.panasonic.com/www-data/pdf/ATK0000/ATK0000CE20.pdf?src-supplier=Farnell, ComponentLink16Description=http://datasheet.octopart.com/EVQ-P7A01P-Panasonic-datasheet-98950114.pdf?src-supplier=Newark, ComponentLink16URL=http://datasheet.octopart.com/EVQ-P7A01P-Panasonic-datasheet-98950114.pdf?src-supplier=Newark, ComponentLink17Description=https://datasheet.octopart.com/EVQ-P7A01P-Panasonic-datasheet-22087671.pdf?src-supplier=Electro+Sonic, ComponentLink17URL=https://datasheet.octopart.com/EVQ-P7A01P-Panasonic-datasheet-22087671.pdf?src-supplier=Electro+Sonic, ComponentLink18Description=http://datasheet.octopart.com/EVQ-P7A01P-Panasonic-datasheet-98950114.pdf?src-supplier=Quest, ComponentLink18URL=http://datasheet.octopart.com/EVQ-P7A01P-Panasonic-datasheet-98950114.pdf?src-supplier=Quest, ComponentLink19Description=https://www3.panasonic.biz/ac/e_download/control/switch/light-touch/catalog/sw_lt_eng_3529s_side.pdf?src-supplier=TTI, ComponentLink19URL=https://www3.panasonic.biz/ac/e_download/control/switch/light-touch/catalog/sw_lt_eng_3529s_side.pdf?src-supplier=TTI, ComponentLink20Description=https://www3.panasonic.biz/ac/e_download/control/switch/light-touch/catalog/sw_lt_eng_3529s_side.pdf?src-supplier=NAC+Semi, ComponentLink20URL=https://www3.panasonic.biz/ac/e_download/control/switch/light-touch/catalog/sw_lt_eng_3529s_side.pdf?src-supplier=NAC+Semi, Electrical Life=100000Cycles, Illumination Type=Non-Illuminated, Item Type="Tactile Switch", Lead Free="Lead Free", Manufacturer Part Number=EVQ-P7A01P, Mechanical Life=100000Cycles, Mounting Technology="Surface Mount", Orientation="Right Angle", Packaging="Tape and Reel", Pricing="1=0.28, 10=0.258, 50=0.258, 100=0.213, 1000=0.169, 10000=0.133 (USD)", Radiation Hardening=No, Reach SVHC Compliant=Unknown, RoHS=Yes, Series=EVQP7, Stock=47904, Supplier=Mouser, Switch Function=Off-Mom, Switch Travel=0.2mm, Termination="Gull Wing", Throw Configuration=SPST
U1: "IC REG BOOST 5V 1A 9WLCSP", LCSC Part Number=C890712, Manufacturer="ON Semiconductor / Fairchild", ComponentLink1Description=https://datasheet.ciiva.com/29732/fan48610-29732973.pdf?src-supplier=Digi-Key, ComponentLink1URL=https://datasheet.ciiva.com/29732/fan48610-29732973.pdf?src-supplier=Digi-Key, ComponentLink2Description=https://datasheet.ciiva.com/29732/fan48610-29732983.pdf?src-supplier=Digi-Key, ComponentLink2URL=https://datasheet.ciiva.com/29732/fan48610-29732983.pdf?src-supplier=Digi-Key, ComponentLink3Description=https://datasheet.ciiva.com/30018/fan48610-30018312.pdf?src-supplier=Avnet, ComponentLink3URL=https://datasheet.ciiva.com/30018/fan48610-30018312.pdf?src-supplier=Avnet, Item Type=IC, Manufacturer Part Number=FAN48610UC50X, Pricing="893=0.4144, 900=0.4032, 1800=0.392, 4500=0.3808, 9000=0.3696, 45000=0.3584, 90000=0.3472 (USD)", RoHS=Yes, Stock=1164000, Supplier=Avnet, Supplier Part Number=FAN48610UC50X
U2: "IC SUPERVISOR 1 CHANNEL 6WLP", LCSC Part Number=C1019998, Manufacturer="Analog Devices", Supplier Part Number=700-MAX16150AWT+, Category="Voltage Supervisors", Item Type=IC, Manufacturer Part Number=MAX16150AWT+, Pricing="1=3.1, 10=2.78, 50=2.63, 100=2.28, 1000=1.75, 10000=1.69 (USD)", RoHS=No, Stock=13, Supplier=Mouser
U3: "IC REG LINEAR 3V 300MA 4X2SON", LCSC Part Number=C2870830, Manufacturer="Texas Instruments", Supplier Part Number=595-TLV73330PDQNR, Category="Voltage Regulators - Linear", ComponentLink1Description=http://www.ti.com/general/docs/suppproductinfo.tsp?distId=10&amp;gotoUrl=http%3A%2F%2Fwww.ti.com%2Flit%2Fgpn%2Ftlv733p&src-supplier=Digi-Key, ComponentLink1URL=http://www.ti.com/general/docs/suppproductinfo.tsp?distId=10&amp;gotoUrl=http%3A%2F%2Fwww.ti.com%2Flit%2Fgpn%2Ftlv733p&src-supplier=Digi-Key, Item Type=IC, Manufacturer Part Number=TLV73330PDQNR, Pricing="1=0.39, 10=0.255, 50=0.255, 100=0.137, 1000=0.084, 10000=0.058 (USD)", RoHS=Yes, Stock=14746, Supplier=Mouser
U4: "500MA USB COMPATIBLE SINGLE CELL", LCSC Part Number=C3682710, Manufacturer="ON Semiconductor", Supplier Part Number=488-FAN54120UC420XCT-ND, Item Type=IC, Manufacturer Part Number=FAN54120UC420X, Pricing="1=0.83, 10=0.745, 25=0.7072, 100=0.5429, 250=0.47976, 500=0.4545, 1000=0.3535 (USD)", RoHS=Yes, RoHS Compliant=Yes, Stock=2603, Supplier=Digi-Key
U5: "MOSFET P-CH 20V 3.6A 3LGA", Case/Package=LGA, Continuous Drain Current (ID)=3.6A, Drain to Source Voltage (Vdss)=20V, Input Capacitance=385pF, LCSC Part Number=C2872196, Manufacturer="Texas Instruments", Max Operating Temperature=150°C, Max Power Dissipation=500mW, Min Operating Temperature=-55°C, Supplier Part Number=595-CSD25501F3, Category="Integrated Circuits (ICs)", ComponentLink1Description=http://www.ti.com/lit/ds/symlink/csd25501f3.pdf?src-supplier=Digi-Key, ComponentLink1URL=http://www.ti.com/lit/ds/symlink/csd25501f3.pdf?src-supplier=Digi-Key, ComponentLink2Description=http://www.ti.com/general/docs/suppproductinfo.tsp?distId=10&amp;gotoUrl=http%3A%2F%2Fwww.ti.com%2Flit%2Fgpn%2Fcsd25501f3&src-supplier=Digi-Key, ComponentLink2URL=http://www.ti.com/general/docs/suppproductinfo.tsp?distId=10&amp;gotoUrl=http%3A%2F%2Fwww.ti.com%2Flit%2Fgpn%2Fcsd25501f3&src-supplier=Digi-Key, Element Configuration=Single, Item Type=IC, Manufacturer Part Number=CSD25501F3, Mounting Technology="Surface Mount", Packaging="Cut Tape", Pins=3, Pricing="1=0.45, 10=0.34, 50=0.34, 100=0.212, 1000=0.112, 10000=0.086 (USD)", Rds On Max=76mR, RoHS=Yes, RoHS Compliant=Yes, Series=FemtoFET™, Stock=42227, Supplier=Mouser
U6: "RF TXRX MODULE BT TRACE ANT SMD", Case/Package=Module, Current - Receiving=11.7mA, Current - Transmitting=16mA, Frequency=2.4GHz, Manufacturer="Taiyo Yuden", Max Operating Temperature=85°C, Min Operating Temperature=-40°C, Supplier Part Number=2889504, Category="RF Receivers, Transceivers", ComponentLink1Description=http://www.yuden.co.jp/to/b0060?src-supplier=Digi-Key, ComponentLink1URL=http://www.yuden.co.jp/to/b0060?src-supplier=Digi-Key, Data Rate=1Mbps, Interface=UART, Manufacturer Part Number=EYSHSNZWZ, Memory Size=64KB, Mounting Technology="Surface Mount", Packaging="Cut Tape", Pricing="1=14.18, 10=11.82 (GBP)", RoHS=Yes, RoHS Compliant=Yes, Sensitivity=-94dBm, Series=EYSHSN, Supplier=Farnell
U7: "MOSFET N-CH 20V 224MA 3XLLGA", LCSC Part Number=C179628, Manufacturer="ON Semiconductor", Category=MOSFETs, ComponentLink1Description=https://datasheet.ciiva.com/24010/ntns3193nz-d-260351-24010388.pdf?src-supplier=Mouser, ComponentLink1URL=https://datasheet.ciiva.com/24010/ntns3193nz-d-260351-24010388.pdf?src-supplier=Mouser, ComponentLink2Description=https://datasheet.ciiva.com/30022/ntns3193nz-d-30022416.pdf?src-supplier=Avnet, ComponentLink2URL=https://datasheet.ciiva.com/30022/ntns3193nz-d-30022416.pdf?src-supplier=Avnet, Item Type=IC, Manufacturer Part Number=NTNS3193NZT5G, Pricing="1405=0.26344, 1500=0.25632, 2900=0.2492, 7100=0.24208, 15000=0.23496, 71000=0.22784, 150000=0.22072 (USD)", RoHS=Yes, Stock=720374, Supplier=Avnet, Supplier Part Number=NTNS3193NZT5G
U8: "IMU ACCEL/GYRO I2C/SPI 14LGA", LCSC Part Number=C5368700, Manufacturer="Bosch Sensortec", Supplier Part Number=1168362, Category=Uncategorized, Item Type=IC, Manufacturer Part Number=BMI323, RoHS=No, Supplier="Future Electronics"
U9: "SENSOR FLIPCORE/HALL SPI 12WLCSP", LCSC Part Number=C171681, Manufacturer="Bosch Sensortec", Supplier Part Number=2457371, Category="Magnetic Sensors", ComponentLink1Description=https://datasheet.ciiva.com/18575/bst-bmm150-ds001-01-18575453.pdf?src-supplier=Digi-Key, ComponentLink1URL=https://datasheet.ciiva.com/18575/bst-bmm150-ds001-01-18575453.pdf?src-supplier=Digi-Key, Item Type=IC, Manufacturer Part Number=BMM150, Pricing="5=1.686, 25=1.598, 100=1.49, 500=1.37, 1000=1.262 (GBP)", RoHS=Yes, Stock=780, Supplier=Rs

## Free pads (board coordinates)
  round 0 hole 0.2 unplated: 1(2.499,9.084) 1(3.251,9.084) 1(3.622,9.084) 1(3.994,9.084) 1(4.365,9.084) 1(5.127,9.084) 1(5.498,9.084) 1(5.869,9.084)

## Via types
v1: diameter 0.3, hole 0.15, Top Layer to Layer 2, 29 vias
v2: diameter 0.3, hole 0.15, Top Layer to Layer 3, 21 vias
v3: diameter 0.3, hole 0.15, Layer 2 to Bottom Layer, 15 vias
v4: diameter 0.3, hole 0.15, Layer 3 to Bottom Layer, 14 vias
v5: diameter 0.3, hole 0.15, Top Layer to Bottom Layer, 9 vias
v6: diameter 0.3, hole 0.15, Layer 2 to Layer 3, 1 vias

## Nets (pads, with @x,y where several pads share a name; then routed paths per layer and width w, separated by ;. In a path a pad name is that pad's centre, name@x,y a point inside that pad or via, vN(x,y) a via of type N, cw(c..) or ccw(c..) an arc to the next point about the centre after c; other vN are vias at no path point)
3V: C6.1 C7.2 C9.2 C10.2 C11.2 C12.2 J7.1 R1.2 R10.2 R11.2 R12.2 U3.1 U6.8 U7.1 U8.5 U8.8 U8.12 U9.A1 U9.B2 U9.E5 | length 21.2
  Top Layer w0.076: C10.2@1.17,5.984 C10.2 C10.2@1.33,5.961 ; C9.2@1.229,2.193 1.496,2.193 ; v1@1.618,0.538 v1@1.623,0.533 ; U9.A1 2.302,7.681 2.481,7.86 v2(2.481,7.878) ; C11.2@2.946,7.664 C11.2
  Top Layer w0.254: R12.2@3.646,3.619 R12.2 v1(4.534,3.619) 5.625,3.619 5.884,3.36 5.884,1.478 5.599,1.193 U8.12@3.748,1.193
  Layer 2 w0.356: v1(1.623,0.462) 2.021,0.462 2.359,0.801 v1(2.359,2.193)
  Layer 2 w0.381: v1(1.592,5.893) 1.592,4.691 1.918,4.365 v3(3.429,4.365) 4.316,4.365 4.534,4.146 v1(4.534,3.619)
  Layer 3 w0.076: v2@2.498,7.862 v2@2.542,7.906
  Layer 3 w0.152: v2@2.542,7.906 v4(4.556,7.906)
  Bottom Layer w0.076: R1.2 v4(4.556,7.906) ; C7.2@8.059,6.031 8.059,6.476
  Bottom Layer w0.152: 4.748,8.446 4.748,11.399 5.008,11.659 v5(5.436,11.659)
  Bottom Layer w0.178: R10.2@6.836,8.526 R10.2 ; C6.1@7.621,6.819 C6.1@7.716,6.819
  other v5: 8.143,5.769
5V: C3.2 J4.1 LED1.2 R13.2 U1.A1 U1.A2 U3.4 | length 8.6
  Top Layer w0.102: LED1.2 2.174,4.567 v2(2.174,4.84)
  Layer 3 w0.254: v2(0.457,8.32) 0.457,5.064 0.681,4.84 v2(2.174,4.84) 2.174,3.425 2.337,3.262 3.285,3.262 3.429,3.119 v4@3.429,2.769
  Bottom Layer w0.102: v4@3.429,2.865 U3.4
  other v4: 3.429,2.767
5V_USB: C4.2 J3.1 R2.2 R5.2 U4.1 | length 4.4
  Top Layer w0.127: R2.2 2.896,5.853 3.087,5.662 6.016,5.662 6.325,5.353 6.432,5.353 6.494,5.292 J3.1@6.494,4.818
  other v2: 6.334,4.42 6.334,4.818
  other v4: 5.72,3.515 6.01,3.505
AN1: J4.2 U6.23 | length 8.2
  Layer 2 w0.102: v1(0.457,7.07) 1.416,7.07 3.032,5.453 6.064,5.453 7.196,6.586 v1(7.196,6.893)
AN2: J4.3 U6.9 | length 9
  Layer 2 w0.102: v1(0.457,5.82) 0.897,6.259 1.723,6.259 2.885,5.098 6.27,5.098 v1(8.064,6.891)
AN3: J4.4 U6.10 | length 11.6
  Top Layer w0.127: J4.4 0.875,4.988 0.875,6.39 v1@0.704,6.562
  Top Layer w0.254: v1(7.678,7.645) U6.10
  Layer 2 w0.102: v1(0.707,6.559) 1.675,6.559 2.959,5.275 6.176,5.275 7.678,6.777 v1(7.678,7.645)
AN4: J4.5 U6.3 | length 13.2
  Layer 3 w0.102: v2(0.457,3.32) 0.457,2.633 0.808,2.282 2.107,2.282 2.977,1.412 5.583,1.412 6.743,2.572 6.743,5.128 6.577,5.294 5.3,5.294 5.134,5.46 v2(5.134,6.395)
AN5: J4.6 U6.24 | length 13.1
  Layer 3 w0.102: v2(0.457,2.07) 2.068,2.07 2.903,1.234 5.657,1.234 6.921,2.498 6.921,5.201 6.508,5.615 6.508,7.322 6.831,7.645 v2(7.159,7.645)
BAT_ADC: R6.1 R9.2 U6.4 | length 1.4
  Layer 2 w0.127: v1(5.734,6.395) 5.734,6.741 5.828,6.835 v3(6.212,6.835)
  Bottom Layer w0.076: 6.065,6.671 6.212,6.818 v3(6.212,6.835) 6.212,7.096 6.236,7.073 ; R6.1 R6.1@6.214,7.302
BAT_STAT: R8.1 U6.5 | length 1.2
  Layer 2 w0.127: v3(5.687,5.73) 6.071,5.73 6.334,5.993 v1(6.334,6.395)
CLR_POWER: R1.1 U2.B3 U6.25 | length 1.9
  Top Layer w0.076: U6.25 4.666,7.564 v1(5.027,7.564)
  Layer 2 w0.127: v3(4.371,7.078) 4.371,7.474 4.461,7.564 v1(5.027,7.564)
  Bottom Layer w0.076: U2.B3 v3(4.371,7.078)
ENABLE: U1.B3 U2.B1 U3.3 | length 14.8
  Layer 2 w0.127: v3(1.114,0.861) 1.656,0.861 1.911,1.116 1.911,3.271 2.133,3.493 4.078,3.493 4.44,3.131 v5(4.454,3.131)
  Layer 3 w0.076: v4(3.928,8.225) 2.293,8.225 2.031,7.963 2.031,5.687 2.544,5.173 2.544,4.318 3.07,3.792 4.332,3.792 4.454,3.67 v5@4.454,3.08
  Bottom Layer w0.076: v3(1.114,0.861) v3(1.114,0.861) ; U1.B3@1.41,0.862 U1.B3
  Bottom Layer w0.152: v3(1.114,0.861) U1.B3@1.41,0.862
GND: C1.1 C2.1 C3.1 C4.1 C5.1 C6.2 C7.1 C8.1 C9.1 C10.1 C11.1 C12.1 J2.1 J3.2 J4.7 J7.5 LED1.3 Q1.2 R3.2 R4.1 R9.1 SW1.1 U1.C1 U1.C2 U1.C3 U2.A2 U3.2 U3.5 U4.5 U4.7 U6.1 U6.13 U6.18 U6.26 U8.1 U8.6 U8.7 U9.A5 U9.C1 U9.C5 U9.E1 U9.E3 | length 18.9
  Top Layer w0.076: U9.E3 1.733,7.098 1.736,7.1 ; LED1.3 v1(1.598,3.713) v1@1.623,3.713 ; U6.13 U6.13@6.934,8.545
  Top Layer w0.152: U9.A5 2.848,6.532 ; C11.1@2.937,7.029 C11.1@2.962,7.054 ; C11.1 2.965,7.079 v1(3.178,7.078) v1(3.178,7.078) ; U6.18 v1(4.095,8.545)
  Top Layer w0.254: U8.1@3.588,2.853 v2@3.809,2.853 ; U6.26@6.097,7.293 6.925,8.121 6.925,8.137 v2@6.934,8.145
  Layer 2 w0.152: v1(0.457,0.82) 0.485,0.791 0.485,0.5 0.575,0.411 v3(0.964,0.411) ; v3(3.095,6.619) v1(3.178,7.078) 3.206,7.106 3.206,7.399 3.245,7.438 v3@3.245,7.478
  Layer 3 w0.152: v4(3.754,3.515) 3.754,3.483 3.885,3.352 v2(3.885,2.853) ; v2@3.846,2.815 4.6,2.815 5.004,3.219 5.004,3.439 v4(5.01,3.445) ; v4(6.821,6.922) 6.834,6.909 7.267,6.909 7.542,7.184 v4(7.542,7.962) 7.536,7.962 7.352,8.145 v2@6.989,8.145
  Bottom Layer w0.076: 4.079,3.84 U3.2 ; R9.1@6.236,5.781 6.236,5.312 U4.7@6.725,4.823 ; C8.1@6.821,6.538 v4(6.821,6.922) ; C7.1@7.41,5.981 7.41,5.508 U4.7@6.725,4.823 ; U4.5 U4.7 U4.7@6.725,4.823
  Bottom Layer w0.102: C2.1 v3@0.907,0.443
  Bottom Layer w0.127: SW1.1@2.198,8.125 SW1.1@2.399,8.326
  Bottom Layer w0.152: 2.896,8.602 v5(2.896,11.659)
  Bottom Layer w0.254: v4(3.754,3.515) 4.079,3.84 ; v4@4.985,3.395 4.985,2.932 4.989,2.928
  other v1: 5.174,4.268 5.455,4.268 5.174,4.553 5.455,4.553 3.534,6.086
  other v2: 6.985,8.145
  other v3: 7.981,0.913 7.981,1.466 7.313,4.419 3.22,7.478
HV_LED_DATA: LED1.4 R13.1 U7.3
LED_DATA: R12.1 U6.22 U7.2 | length 3.6
  Top Layer w0.076: 3.987,4.169 3.991,4.174 v2@3.991,4.814 ; 3.991,4.974 v2@3.991,4.814 ; v2(3.997,4.814) v2@3.991,4.814 ; v2(4.659,6.82) U6.22
  Layer 3 w0.152: v2(3.997,4.814) 4.523,4.814 4.659,4.95 v2(4.659,6.82)
NetC8_2: C8.2 U6.7 | length 0.7
  Layer 3 w0.076: v4(6.821,5.744) v4@6.846,5.769
  Layer 3 w0.152: v4@6.846,5.769 v2(7.534,5.769)
NetL1_1: L1.1 U1.B1 U1.B2 | length 2.3
  Layer 2 w0.356: v3@2.89,0.865 v3(2.89,2.38) ; v3@2.89,2.382 v3(2.89,2.721)
  Bottom Layer w0.152: U1.B1 2.617,0.863
  other v3: 2.888,0.87
NetQ1_1: Q1.1 R8.2
NetQ1_3: Q1.3 R7.2 U5.1
NetR3_1: R3.1 U4.2
NetR5_1: R5.1 U4.3
NetSW1_2: SW1.2 U2.A3 | length 1.2
  Bottom Layer w0.102: SW1.2@0.748,8.125 0.748,7.318 1.013,7.053
NetU6_11: U6.11 U6.12
POWER_DET: R2.1 R4.2 U6.21 | length 0.6
  Top Layer w0.127: R2.1 2.346,5.978 2.371,5.978 2.418,6.025 R2.1@2.418,6.05 ; 2.702,6.256 3.106,6.256 3.128,6.278 ; v1@3.522,6.658 v1(3.534,6.67)
RST: J7.3 U6.19 | length 5.1
  Layer 2 w0.127: v1(3.534,7.997) 3.102,7.997 2.896,8.203 2.896,9.322 3.179,9.605 3.179,11.386 3.452,11.659 v5(4.166,11.659)
RX: J5.1 U6.20 | length 6.2
  Top Layer w0.254: v1(2.017,8.471) J5.1
  Layer 2 w0.102: v1(2.017,8.471) 2.017,6.971 3.18,5.809 3.832,5.809 3.987,5.963 3.987,7.175 3.892,7.27 v1(3.636,7.27)
SCL: R11.1 U6.15 U8.13 U9.A3 | length 13.6
  Layer 3 w0.076: v2@2.576,7.234 2.184,6.841 2.184,5.75 2.697,5.237 2.697,4.381 3.133,3.944 5.083,3.944 5.274,3.753 5.274,3.167 4.684,2.578 4.124,2.578 3.902,2.356 3.902,1.962 v2(4.172,1.693) ; v2(2.576,7.259) 2.637,7.259 2.755,7.141 3.739,7.141 4.16,7.562 5.494,7.562 5.734,7.802 v2(5.734,8.145) v2@5.734,8.206
  Layer 3 w0.152: v4(5.647,8.576) 5.647,8.293 v2@5.734,8.206
  Bottom Layer w0.076: R11.1 v4(5.647,8.576)
SDA: R10.1 U6.14 U8.14 U9.B4 | length 13.5
  Top Layer w0.152: U9.B4 2.553,6.815 v2(2.576,6.838)
  Layer 3 w0.076: v2(2.576,6.838) 2.637,6.838 2.753,6.954 3.768,6.954 4.223,7.409 5.933,7.409 6.334,7.811 v2(6.334,8.145) ; v2@2.601,6.838 2.576,6.863 2.336,6.623 2.336,5.813 2.849,5.3 2.849,4.444 3.192,4.1 5.142,4.1 5.427,3.816 5.427,3.104 4.741,2.418 4.403,2.418 v2(4.172,2.187)
  Layer 3 w0.152: v4(6.123,8.564) 6.322,8.364 6.322,8.157 v2(6.334,8.145)
SWDCLK: J7.4 U6.16 | length 3
  Layer 3 w0.127: v5(4.166,10.389) 4.55,10.389 4.748,10.19 4.748,8.285 4.885,8.149 v2(5.131,8.149)
SWDIO: J7.2 U6.17 | length 2.9
  Layer 2 w0.127: v1(4.534,8.145) 4.748,8.36 4.748,10.135 5.002,10.389 v5(5.436,10.389)
TX: J6.1 U6.2 | length 5.7
  Layer 2 w0.102: v1(1.301,8.471) 1.301,7.436 3.106,5.631 4.405,5.631 4.534,5.761 v1(4.534,6.395)
V_MON: R6.2 U5.3
VBAT: C1.2 C2.2 C5.2 J1.1 L1.2 R7.1 U1.A3 U2.A1 U4.6 U5.2 | length 19.7
  Layer 2 w0.381: v6(0.993,5.425) 0.993,1.91 v3(1.285,1.618)
  Layer 3 w0.152: v4(5.127,7.078) 5.915,7.078 6.652,7.815 6.652,8.521 6.755,8.623 7.882,8.623 7.994,8.511 7.994,7.576 7.841,7.422 7.841,3.714 v5(7.642,3.515)
  Layer 3 w0.203: v6(0.993,5.425) 0.993,8.206 1.388,8.602 v4(4.011,8.602)
  Bottom Layer w0.076: R7.1 5.127,6.825 v4(5.127,7.078)
  Bottom Layer w0.203: U2.A1 3.528,8.351
  other v5: 7.104,0.609
pads on no net: J3.MH J7.6 J7.MP1 J7.MP2 J7.MP3 LED1.1 U2.B2 U4.4 U6.6 U6.27 U6.28 U8.2 U8.3 U8.4 U8.9 U8.10 U8.11 U9.D2 U9.D4

## Polygon pours and split planes (outlines as drawn)
GND on Bottom Layer "GND_L04_P004" (solid, pour order 4): 0.855,12.81 7.468,12.81 7.468,9.265 0.855,9.265
GND on Bottom Layer "GND_L04_P008" (solid, pour order 8): 4.341,0.212 4.341,6.579 8.245,6.579 8.245,0.212
GND on Layer 2 "GND_L02_P003" (solid, remove dead copper, pour order 3): 0.102,8.898 8.276,8.898 8.276,0.094 0.102,0.094
GND on Layer 3 "GND_L03_P000" (solid, pour order 0): 0.102,8.898 8.276,8.898 8.276,0.094 0.102,0.094

## Other copper
Top Layer:
  rectangle net 3V: 0.934,2.017 2.699,2.368
  rectangle net 3V: 0.934,0.228 2.136,0.838
  rectangle net LED_DATA: 3.599,3.868 4.172,5.498
  rectangle net HV_LED_DATA: 2.678,4.285 3.326,4.555
  rectangle net GND: 6.784,8.145 7.151,8.695
  rectangle net GND: 4.391,4.003 5.627,5.498
  rectangle net RST: 3.377,7.72 4.086,8.194
  rectangle net 3V: 1.916,7.53 3.115,8.032
  rectangle net GND: 2.81,6.455 3.015,7.005
  rectangle net GND: 1.63,6.432 2.312,6.632
  rectangle net POWER_DET: 3.135,6.594 3.534,6.721
  rectangle net POWER_DET: 3.135,6.17 3.294,6.696
  rectangle net POWER_DET: 2.212,6.17 3.192,6.342
  rectangle net SCL: 2.202,6.993 2.404,7.376
  rectangle net SCL: 2.202,7.109 2.576,7.41
  rectangle net 3V: 1.916,7.368 2.122,7.943
  rectangle net GND: 1.63,6.432 1.837,7.774
  rectangle net GND: 1.067,7.558 1.741,7.773
  rectangle net GND: 1.849,5.094 2.072,6.628
  rectangle net GND: 1.072,6.995 1.814,7.204
  rectangle net GND: 2.81,6.928 3.178,7.23
  rectangle net 3V: 0.812,6.764 1.272,6.908
  rectangle net 3V: 0.813,6.764 0.971,8.033
  rectangle net 3V: 0.832,7.871 2.017,8.032
  rectangle net 3V: 1.059,5.742 1.272,6.892
  rectangle net 3V: 7.984,5.61 8.286,6.397
  rectangle net NetC8_2: 7.384,5.61 7.686,6.397
  rectangle net 3V: 1.111,5.743 1.592,6.043
  rectangle net CLR_POWER: 4.384,7.42 5.227,7.72
  rectangle net GND: 0.934,0.988 2.106,1.868
  rectangle net 5V_USB: 6.184,4.191 8.197,5.5
  rectangle net POWER_DET: 2.211,5.133 2.481,6.342
  rectangle net GND: 1.648,3.488 1.837,5.318
  rectangle net GND: 1.111,5.096 1.931,5.503
  rectangle net 5V: 1.945,4.338 2.395,4.97
  rectangle net 5V: 1.945,4.688 3.326,5.005
  rectangle net GND: 3.413,2.548 4.083,3.159
  rectangle net GND: 1.095,3.488 1.745,3.938
  rectangle net HV_LED_DATA: 1.945,3.488 2.989,4.093
  rectangle net HV_LED_DATA: 2.678,3.493 2.995,4.555
  rectangle net LED_DATA: 3.119,3.868 4.172,4.138
  rectangle net 3V: 3.119,3.484 4.172,3.754
  rectangle net 3V: 2.606,0.988 3.162,2.368
  rectangle net GND: 0.207,0.988 2.106,1.61
  rectangle net GND: 0.207,0.82 0.707,1.375
  rectangle net 3V: 2.737,0.988 4.053,1.375
  rectangle net GND: 1.061,0.988 1.361,1.858
  rectangle net NetU6_11: 7.384,8.211 8.284,8.633
  rectangle net SCL: 3.443,1.518 4.384,1.868
  rectangle net SDA: 3.443,2.018 4.384,2.368
  rectangle net VBAT: 6.2,3.158 8.186,3.868
  rectangle net VBAT: 6.2,0.475 6.784,3.713
  rectangle net VBAT: 6.2,0.325 7.384,0.868
Layer 3:
  rectangle net VBAT: 6.946,0.3 7.254,0.775
  rectangle net VBAT: 1.266,1.485 1.73,1.76
  rectangle net 5V_USB: 5.569,3.335 6.493,4.989